# Altium PCB ide_podule-8bit_horiz.PcbDoc
Units mm, origin at the board's own origin, x right, y up, seen from the top; angles counter-clockwise.
Board outline 131.8 x 66.47 mm, 4 copper layers (Top Layer, GND, VCC, Bottom Layer), stack 0.603 mm thick; 34 components, 77 nets, 354 pads, 143 vias.
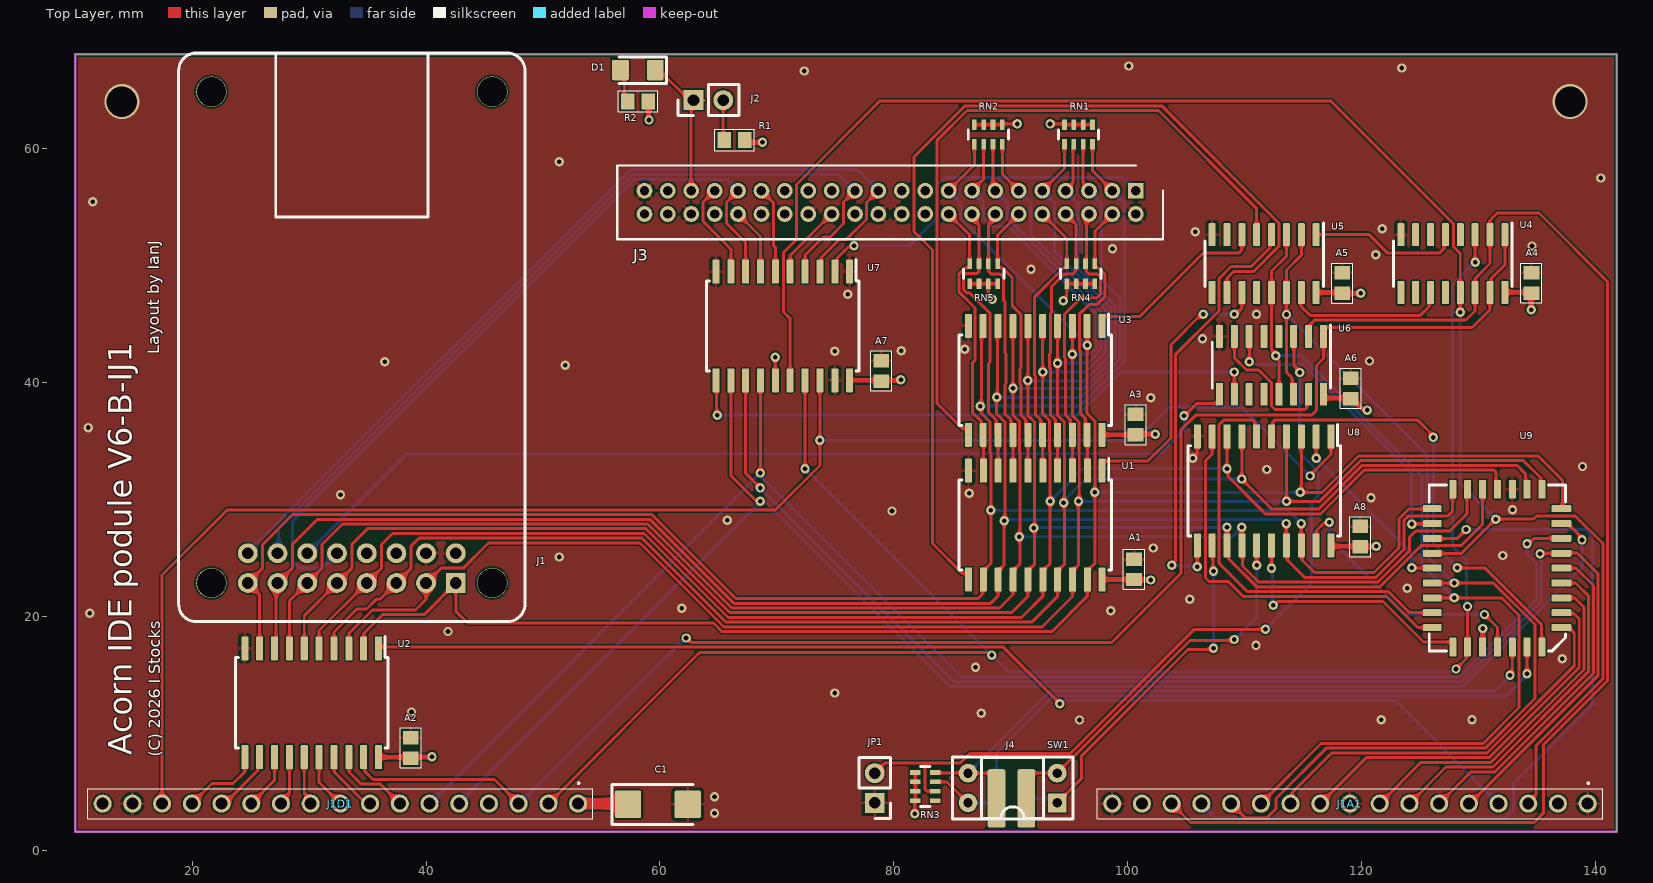
[diagram p0: Top Layer view]
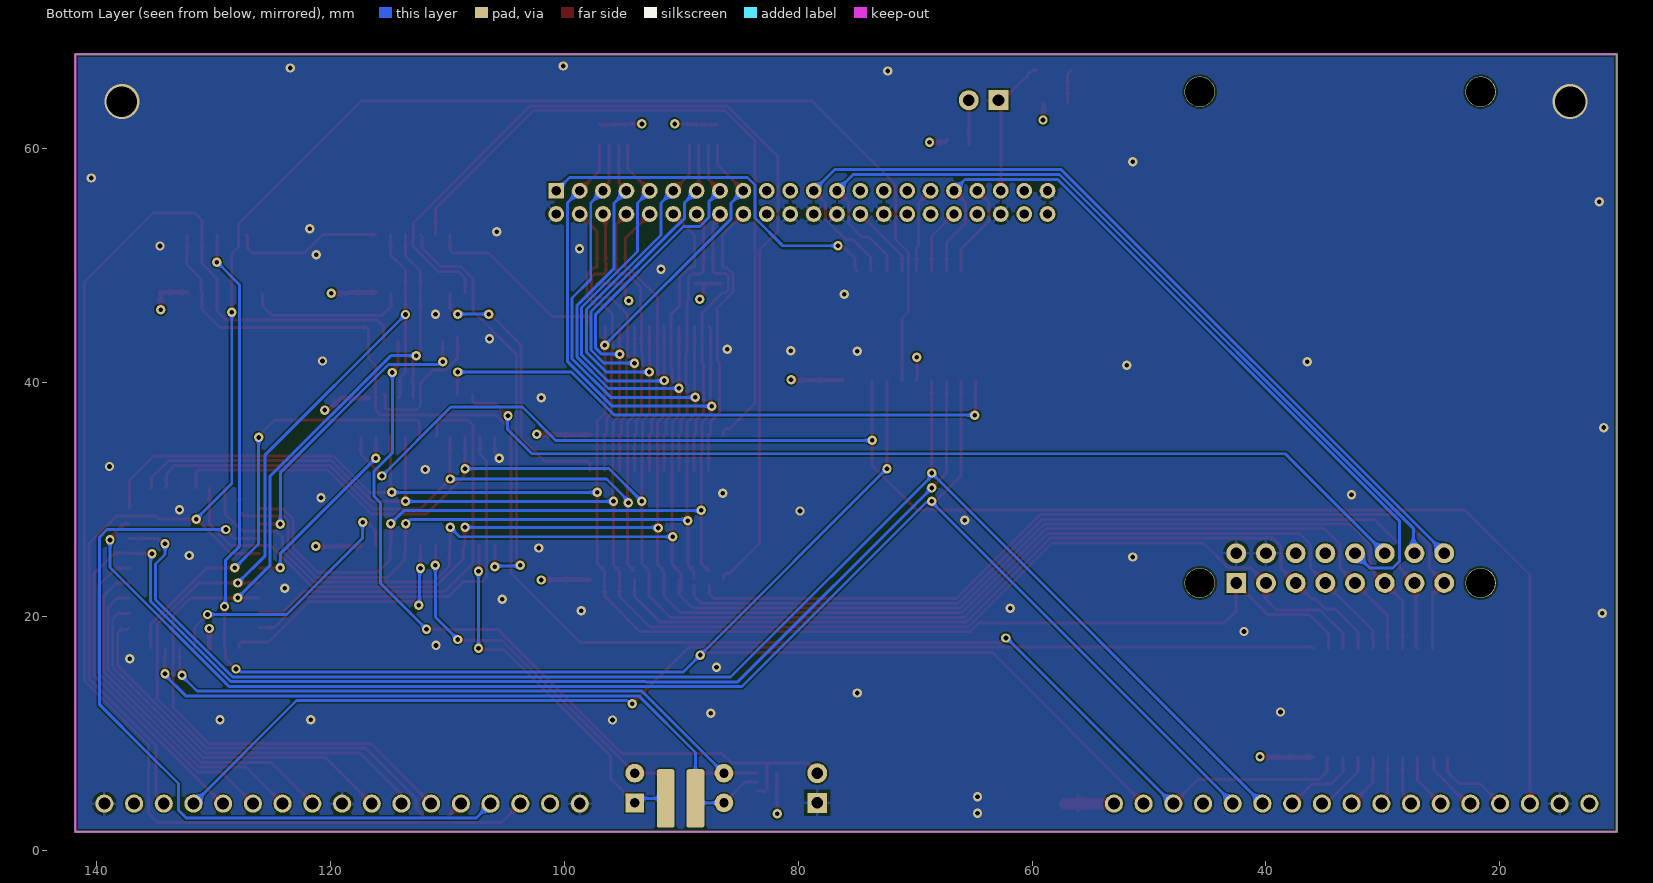
[diagram p1: Bottom Layer view, seen from below]
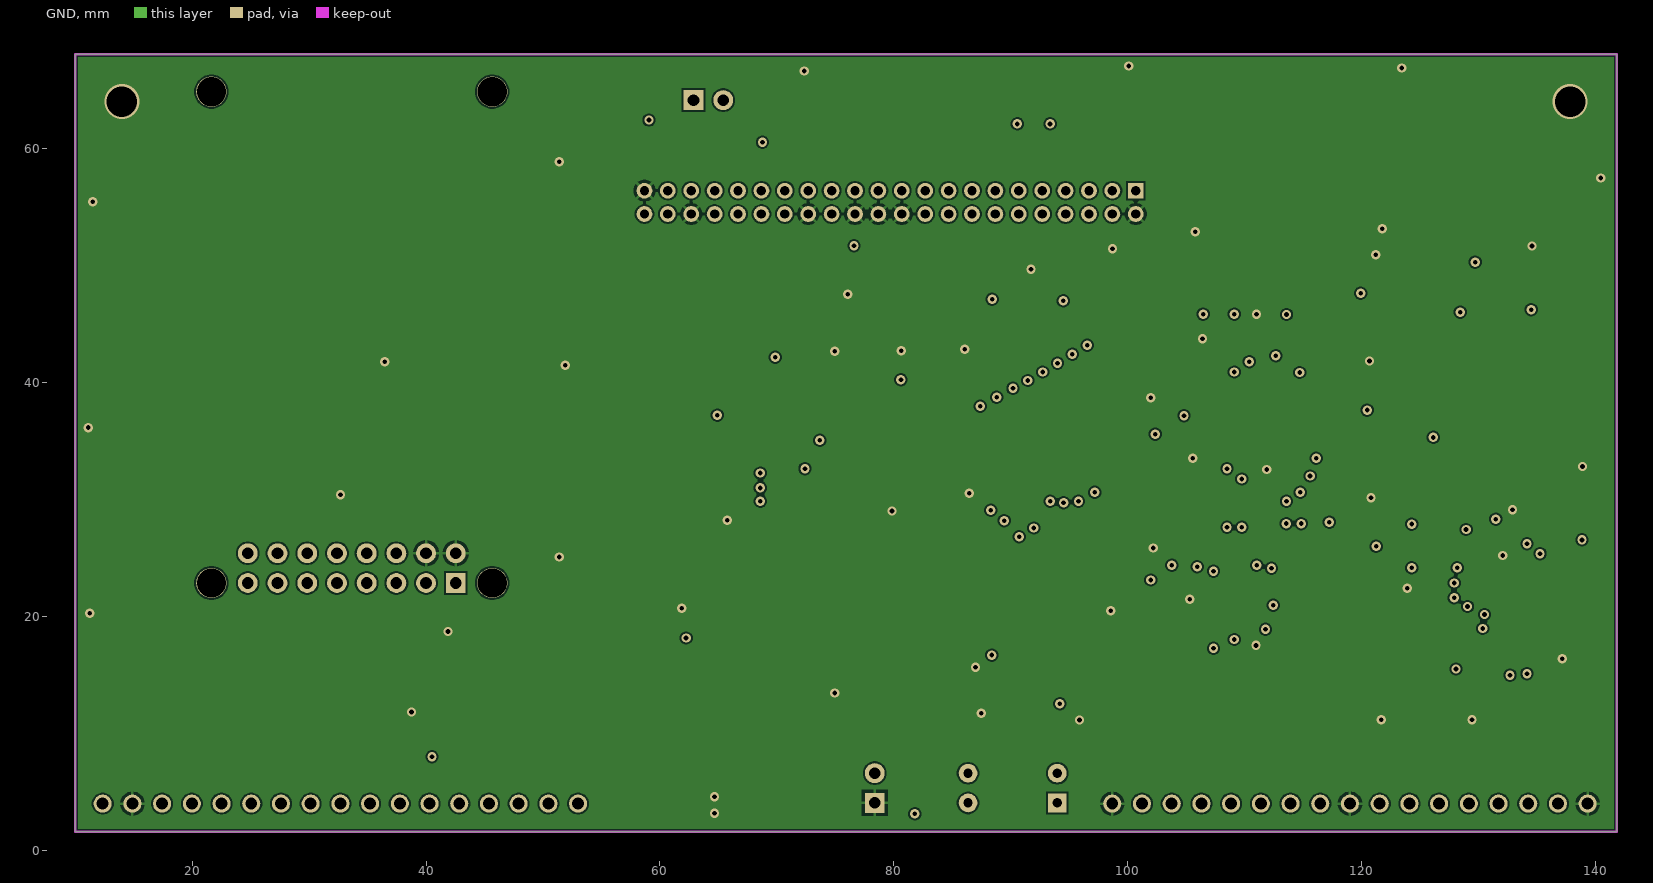
[diagram p2: GND]
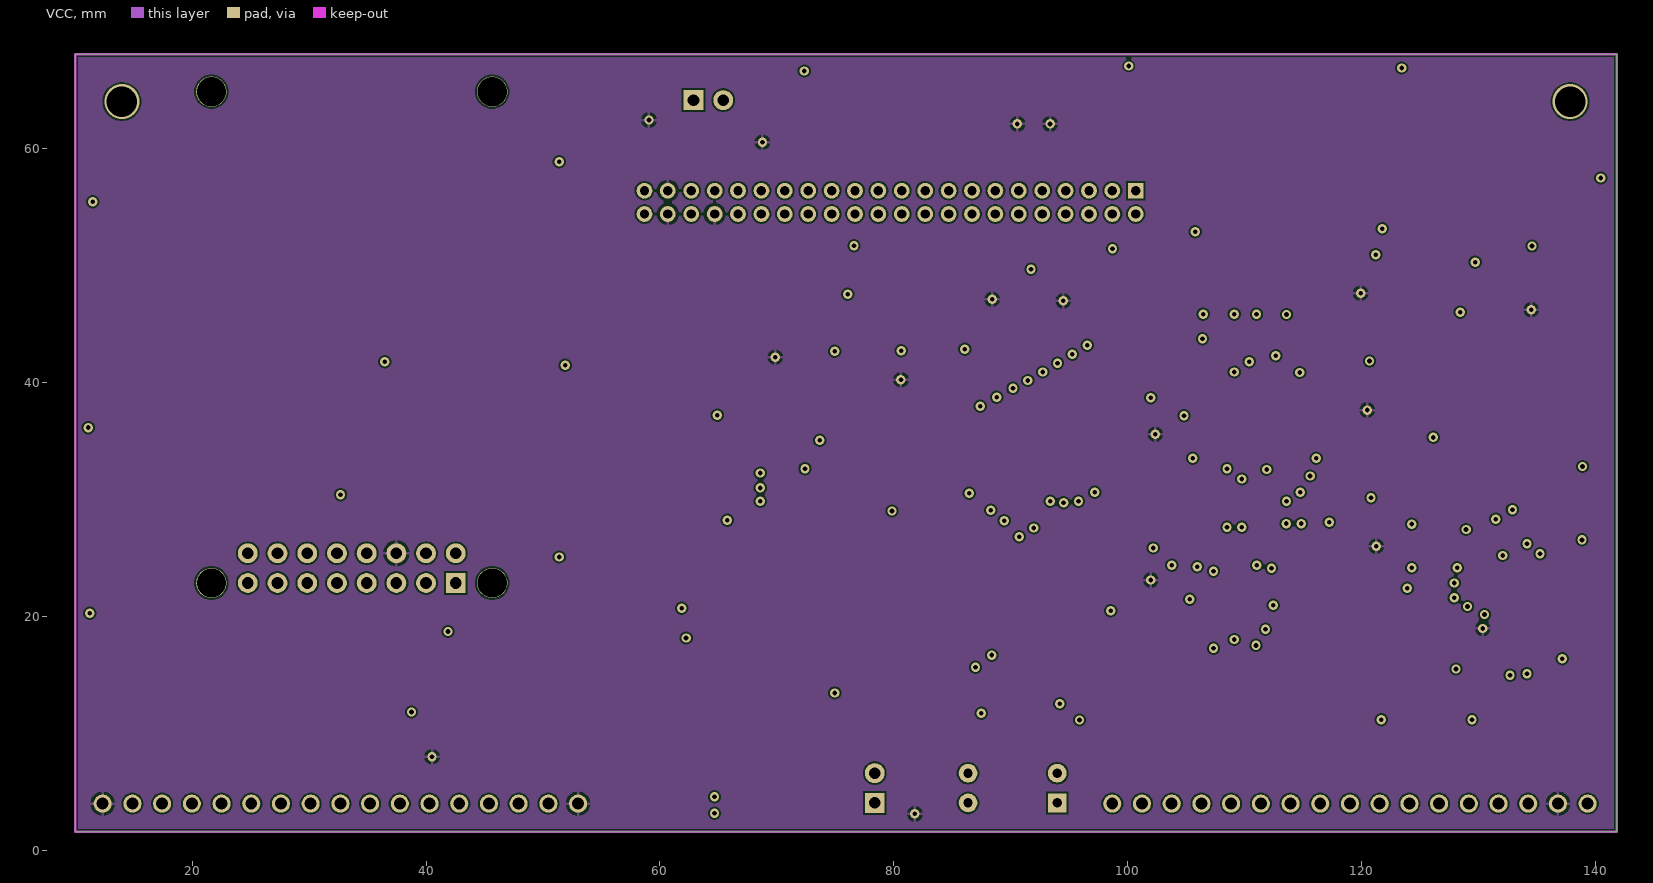
[diagram p3: VCC]

## Layer stack, top to bottom
Top Solder: solder mask 0.0102, Solder Resist, Dk 3.5
Top Layer: signal copper 0.0356
Dielectric 1: prepreg 0.0711, PP-006, Dk 4.1
GND: signal copper 0.035
Dielectric 2: prepreg 0.0711, PP-006, Dk 4.1
VCC: signal copper 0.035
Dielectric2: dielectric 0.32, FR-4, Dk 4.8
Bottom Layer: signal copper 0.0356
Bottom Solder: solder mask 0.0102, Solder Resist, Dk 3.5

## Board outline
10,1.6 141.8,1.6 141.8,68.072 10,68.072

## Design rules (kind name [scope] priority, off if disabled: settings)
Clearance [All] p1: gap=0.15 ignorepadtopadclearanceinfootprint=FALSE
DiffPairsRouting [All] p1: maxlimit=0.254 minlimit=0.254 mostfreqgap=0.254 toplayer_minwidth=0.254 toplayer_maxwidth=0.381 toplayer_prefwidth=0.254 midlayer1_minwidth=0.254 midlayer1_maxwidth=0.381 midlayer1_prefwidth=0.254 midlayer2_minwidth=0.254 midlayer2_maxwidth=0.381 midlayer2_prefwidth=0.254 bottomlayer_minwidth=0.254 bottomlayer_maxwidth=0.381 bottomlayer_prefwidth=0.254 maxuncoupledlength=12.7
MinimumSolderMaskSliver [All] p1: minsoldermaskwidth=0.1
PolygonConnect [All] p1: connectstyle=Relief reliefconductorwidth=0.254 reliefentries=4 polygonreliefangle="90 Angle" airgapwidth=0.254
RoutingVias [All] p1: holewidth=0.4 width=0.8 viastyle="Through Hole" minholewidth=0.3 minwidth=0.8 maxholewidth=0.711 maxwidth=1.27
SilkToSolderMaskClearance [IsPad] p1: minsilkscreentomaskgap=0.001 clearancetoexposedcopper=TRUE
SolderMaskExpansion [All] p1: expansion=0.102 istentingtop=FALSE
SupplyNets "Schematic Supply Nets_10" [InNet('VCC')] p1: voltage=0.000
SupplyNets "Schematic Supply Nets_3" [InNet('GND')] p2: voltage=0.000
Width [All] p1: maxlimit=0.4 minlimit=0.254 preferedwidth=0.254
27 further rules are at their usual default settings.

## Components (designator, comment, footprint, x,y, rotation, side; value= is the part's Value field where it differs from the comment)
A1 "100n" "RES 0805" 100.52,24.034 r90 top
A2 "100n" "RES 0805" 38.69,8.772 r90 top
A3 "100n" "RES 0805" 100.649,36.399 r90 top
A4 "100n" "RES 0805" 134.493,48.514 r90 top
A5 "100n" "RES 0805" 118.313,48.489 r90 top
A6 "100n" "RES 0805" 119.05,39.497 r90 top
A7 "100n" "RES 0805" 78.92,40.993 r90 top
A8 "100n" "RES 0805" 119.863,26.822 r90 top
C1 "47uF 16V" CP_EIA-6032-20_AVX-F_Pad2.25x2.35mm_HandSolder 59.817,3.937 r0 top
D1 "LED" LED_1206_3216Metric_Pad1.42x1.75mm_HandSolder 58.109,66.708 r180 top
J1 "Conn_02x08_Odd_Even" CH376-mod 24.765,22.86 r180 top
J1A1 "CONN_01X17" TSW-117-XX-YY-S 139.3,4 r180 top
J1D1 "CONN_01X17" TSW-117-XX-YY-S 53,4 r180 top
J2 "CONN_01X02" PinHeader_1x02_P2.54mm_Vertical 62.865,64.135 r90 top
J3 "CONN_02X20" SHDR44W55P200_2X22_4665X630X640P 100.67,56.399 r180 top
J4 "Conn_01x04_Socket" "4 way edge" 91.313,1.905 r180 top
JP1 "Jumper_NC_Small" PinHeader_1x02 78.359,4.064 r180 top
R1 "330R" "RES 0805" 66.365,60.728 r0 top
R2 "330R" "RES 0805" 58.11,64.03 r0 top
RN1 "4K7" R_Array_Concave_4x0603 95.77,61.199 r270 top
RN2 "4K7" R_Array_Concave_4x0603 88.07,61.199 r270 top
RN3 "4K7" R_Array_Concave_4x0603 82.677,5.461 r0 top
RN4 "4K7" R_Array_Concave_4x0603 95.97,49.299 r90 top
RN5 "4K7" R_Array_Concave_4x0603 87.67,49.299 r90 top
SW1 "SW_DIP_x02" DIP-4_W7.62mm_Socket 93.955,4.064 r180 top
U1 "74HC574" SOIC-20W_7.5x12.8mm_P1.27mm 92.086,27.813 r270 top
U2 "74HC245" SOIC-20W_7.5x12.8mm_P1.27mm 30.226,12.622 r270 top
U3 "74HC574" SOIC-20W_7.5x12.8mm_P1.27mm 92.075,40.181 r270 top
U4 "74HC139" SOIC-16_3.9x9.9mm_P1.27mm 127.773,50.165 r270 top
U5 "74HC139" SOIC-16_3.9x9.9mm_P1.27mm 111.644,50.165 r270 top
U6 "74HC139" SOIC-16_3.9x9.9mm_P1.27mm 112.268,41.467 r270 top
U7 "74HC245" SOIC-20W_7.5x12.8mm_P1.27mm 70.496,44.831 r270 top
U8 "74HC273" SOIC-20W_7.5x12.8mm_P1.27mm 111.644,30.734 r270 top value=74AHC273
U9 "SST39SF010" PLCC-32_11.4x14.0mm_P1.27mm 131.583,24.13 r180 top locked

## Footprints (in the part's own frame and the unit in brackets; to place one, negate y for a bottom-side part, rotate by r counter-clockwise, add the part's x,y. Pads: shape width x height; smd on the part's side, far side on the other; paste and mask are expansions set on the pad)
"4 way edge" [mm]
  rrect25% 1.524x5 smd paste-5 mask+0.2: 1(0,-2.54) 2(2.54,-2.54)
  rrect25% 1.524x5 smd far side paste-5 mask+0.2: 3(0,-2.54) 4(2.54,-2.54)
CH376-mod [mm]
  rect 1.7x1.7 hole 1 paste-2539.97 mask+0.2: 1(-17.78,0)
  round 1.7 hole 1 paste-2539.97 mask+0.2: 2(-17.78,-2.54) 3(-15.24,0) 4(-15.24,-2.54) 5(-12.7,0) 6(-12.7,-2.54) 7(-10.16,0) 8(-10.16,-2.54) 9(-7.62,0) 10(-7.62,-2.54) 11(-5.08,0) 12(-5.08,-2.54) 13(-2.54,0) 14(-2.54,-2.54) 15(0,0) 16(0,-2.54)
  round 2.6 hole 2.5 paste-2539.97 mask+0.2: M(-20.89,0) M(-20.89,-42) M(3.11,0) M(3.11,-42)
  silkscreen extent -23.69,-45.3 5.91,3.3
CP_EIA-6032-20_AVX-F_Pad2.25x2.35mm_HandSolder [mm]
  rrect11% 2.25x2.35 smd mask+0.2: 1(-2.55,0) 2(2.55,0)
  silkscreen extent -3.94,-1.71 3,1.71
DIP-4_W7.62mm_Socket [mm]
  rect 1.6x1.6 hole 0.8 paste-2539.97 mask+0.2: 1(0,0)
  rrect100% 1.6x1.6 hole 0.8 paste-2539.97 mask+0.2: 2(0,-2.54) 3(7.62,-2.54) 4(7.62,0)
  silkscreen extent -1.33,-3.93 8.95,1.39
LED_1206_3216Metric_Pad1.42x1.75mm_HandSolder [mm]
  rrect18% 1.425x1.75 smd mask+0.2: 1(-1.488,0) 2(1.488,0)
  silkscreen extent -2.46,-1.13 1.6,1.13
PinHeader_1x02 [mm]
  rect 1.7x1.7 hole 1 paste-2539.97 mask+0.2: 1(0,0)
  rrect100% 1.7x1.7 hole 1 paste-2539.97 mask+0.2: 2(0,-2.54)
  silkscreen extent -1.33,-3.87 1.33,1.33
PinHeader_1x02_P2.54mm_Vertical [mm]
  rect 1.7x1.7 hole 1 paste-2539.97 mask+0.2: 1(0,0)
  rrect100% 1.7x1.7 hole 1 paste-2539.97 mask+0.2: 2(0,-2.54)
  silkscreen extent -1.33,-3.87 1.33,1.33
PLCC-32_11.4x14.0mm_P1.27mm [mm]
  rrect25% 0.6x1.6 smd mask+0.2: 1(0,6.737) 2(-1.27,6.737) 3(-2.54,6.737) 4(-3.81,6.737) 14(-3.81,-6.737) 15(-2.54,-6.737) 16(-1.27,-6.737) 17(0,-6.737) 18(1.27,-6.737) 19(2.54,-6.737) 20(3.81,-6.737) 30(3.81,6.737) 31(2.54,6.737) 32(1.27,6.737)
  rrect25% 1.7x0.6 smd mask+0.2: 5(-5.463,5.08) 6(-5.463,3.81) 7(-5.463,2.54) 8(-5.463,1.27) 9(-5.463,0) 10(-5.463,-1.27) 11(-5.463,-2.54) 12(-5.463,-3.81) 13(-5.463,-5.08)
  rrect25% 1.6x0.6 smd mask+0.2: 21(5.563,-5.08) 22(5.563,-3.81) 23(5.563,-2.54) 24(5.563,-1.27) 25(5.563,0) 26(5.563,1.27) 27(5.563,2.54) 28(5.563,3.81) 29(5.563,5.08)
  silkscreen extent -5.82,-7.09 5.82,7.09
R_Array_Concave_4x0603 [mm]
  rect 0.9x0.4 smd mask+0.2: 1(-0.85,1.2) 2(-0.85,0.4) 3(-0.85,-0.4) 4(-0.85,-1.2) 5(0.85,-1.2) 6(0.85,-0.4) 7(0.85,0.4) 8(0.85,1.2)
  silkscreen extent -0.4,-1.72 0.4,1.72
"RES 0805" [mm] "Chip Resistor, 2-Leads, Body 2.00x1.25mm, IPC Medium Density"
  rect 1.15x1.35 smd: 1(-0.875,0) 2(0.875,0)
  silkscreen extent -1.7,-0.9 1.7,0.9, body extent -0.95,-0.62 1.05,0.63, height 0.6
SHDR44W55P200_2X22_4665X630X640P [mm]
  rect 1.35x1.35 hole 0.8: 1(0,0)
  round 1.35 hole 0.8: 2(0,2) 3(2,0) 4(2,2) 5(4,0) 6(4,2) 7(6,0) 8(6,2) 9(8,0) 10(8,2) 11(10,0) 12(10,2) 13(12,0) 14(12,2) 15(14,0) 16(14,2) 17(16,0) 18(16,2) 19(18,0) 20(18,2) 21(20,0) 22(20,2) 23(22,0) 24(22,2) 25(24,0) 26(24,2) 27(26,0) 28(26,2) 29(28,0) 30(28,2) 31(30,0) 32(30,2) 33(32,0) 34(32,2) 35(34,0) 36(34,2) 37(36,0) 38(36,2) 39(38,0) 40(38,2) 41(40,0) 42(40,2) 43(42,0) 44(42,2)
  silkscreen extent -2.32,-2.15 44.32,4.15, body extent -2.32,-2.15 44.33,4.15, height 6.2
SOIC-16_3.9x9.9mm_P1.27mm [mm]
  rrect25% 1.95x0.6 smd mask+0.2: 1(-2.475,4.445) 2(-2.475,3.175) 3(-2.475,1.905) 4(-2.475,0.635) 5(-2.475,-0.635) 6(-2.475,-1.905) 7(-2.475,-3.175) 8(-2.475,-4.445) 9(2.475,-4.445) 10(2.475,-3.175) 11(2.475,-1.905) 12(2.475,-0.635) 13(2.475,0.635) 14(2.475,1.905) 15(2.475,3.175) 16(2.475,4.445)
  silkscreen extent -3.45,-5.06 1.95,5.06
SOIC-20W_7.5x12.8mm_P1.27mm [mm]
  rrect25% 2.05x0.6 smd mask+0.2: 1(-4.65,5.715) 2(-4.65,4.445) 3(-4.65,3.175) 4(-4.65,1.905) 5(-4.65,0.635) 6(-4.65,-0.635) 7(-4.65,-1.905) 8(-4.65,-3.175) 9(-4.65,-4.445) 10(-4.65,-5.715) 11(4.65,-5.715) 12(4.65,-4.445) 13(4.65,-3.175) 14(4.65,-1.905) 15(4.65,-0.635) 16(4.65,0.635) 17(4.65,1.905) 18(4.65,3.175) 19(4.65,4.445) 20(4.65,5.715)
  silkscreen extent -5.68,-6.51 3.86,6.51
TSW-117-XX-YY-S [mm]
  round 1.55 hole 1.02: 1(0,0) 2(2.54,0) 3(5.08,0) 4(7.62,0) 5(10.16,0) 6(12.7,0) 7(15.24,0) 8(17.78,0) 9(20.32,0) 10(22.86,0) 11(25.4,0) 12(27.94,0) 13(30.48,0) 14(33.02,0) 15(35.56,0) 16(38.1,0) 17(40.64,0)
  silkscreen extent -1.27,-1.8 41.91,1.27

## Part data
A1 A2 A3 A4 A5 A6 A7 A8: library part C_Small
C1: library part CP
J3: library part CONN_02X22
JP1: library part Jumper_NC_Small-Device
R1 R2: library part R
RN1 RN2 RN3 RN4 RN5: library part R_Pack04
U1 U3: library part 74HCT574_PWR
U4 U5 U6: library part 74LS139
U8: library part 74AHC273
U9: library part SST39SF040

## Via types
v1: diameter 0.8, hole 0.4, Top Layer to Bottom Layer, tented both sides, 141 vias
v2: diameter 3, hole 2.6, Top Layer to Bottom Layer, 2 vias

## Nets (pads, with @x,y where several pads share a name; then routed paths per layer and width w, separated by ;. In a path a pad name is that pad's centre, name@x,y a point inside that pad or via, vN(x,y) a via of type N, cw(c..) or ccw(c..) an arc to the next point about the centre after c; other vN are vias at no path point)
BCS0: J3.37 U7.9 | length 8.3
  Top Layer w0.254: J3.37 63.679,55.408 63.679,53.791 66.051,51.42 U7.9
BCSEL: J3.28 U7.5 | length 6.4
  Top Layer w0.254: U7.5 71.131,50.86 J3.28
BD0: J1D1.7 U2.18 | length 6.7
  Top Layer w0.254: U2.18 33.417,7.956 33.417,6.715 34.471,5.661 36.099,5.661 J1D1.7
BD1: J1D1.8 U2.17 | length 5.5
  Top Layer w0.254: U2.17 32.147,7.956 32.147,6.715 34.478,4.384 34.485,4.384 34.869,4 J1D1.8
BD2: J1D1.9 U2.16 | length 4.7
  Top Layer w0.254: U2.16 30.861,5.819 J1D1.9
BD3: J1D1.10 U2.15 | length 4.2
  Top Layer w0.254: U2.15 29.591,4.9 30.14,4.351 J1D1.10
BD4: J1D1.11 U2.14 | length 4.3
  Top Layer w0.254: J1D1.11 27.6,4.193 28.321,4.914 U2.14
BD5: J1D1.12 U2.13 | length 4.8
  Top Layer w0.254: J1D1.12 27.051,5.991 U2.13
BD6: J1D1.13 U2.12 | length 5.5
  Top Layer w0.254: J1D1.13 22.796,4 25.619,6.823 25.619,7.81 U2.12
BD7: J1D1.14 U2.11 | length 6.9
  Top Layer w0.254: J1D1.14 21.695,5.715 23.495,5.715 24.495,6.715 24.495,7.956 U2.11
BLA2: J1.10 J3.35 U7.8 | length 66.6
  Top Layer w0.254: J3.35 65.675,55.404 65.675,53.609 67.321,51.963 U7.8
  Bottom Layer w0.254: J1.10 31.115,24.13 29.181,24.13 28.575,24.736 28.575,28.131 57.795,57.351 65.718,57.351 J3.35
BLA3: J3.33 U7.6 | length 7.4
  Top Layer w0.254: J3.33 69.718,55.351 69.718,51.694 69.861,51.551 U7.6
BLA4: J3.36 U7.7 | length 5.7
  Top Layer w0.254: J3.36 68.591,52.478 U7.7
CLK2: J1D1.4
CS0: U6.10 U7.11 | length 50.6
  Top Layer w0.254: U7.11 64.839,40.123 64.839,37.269 v1(64.897,37.211) ; U6.10 v1(109.093,40.894)
  Bottom Layer w0.254: v1(64.897,37.211) 95.694,37.211 99.377,40.894 v1(109.093,40.894)
D0: J1.1 J3.17 RN2.5 U1.19 U2.2 U3.2 U8.3 U9.13 | length 165.3
  Top Layer w0.254: U2.2 34.671,18.542 36.283,20.154 39.839,20.154 J1.1 42.545,20.447 43.561,19.431 64.581,19.431 65.308,18.704 93.514,18.704 96.531,21.721 96.531,23.888 97.166,24.523 v1(97.166,30.607) 97.166,36.703 96.52,37.349 v1(96.52,43.18) U3.2 ; J3.17 86.87,58.599 RN2.5 ; v1(114.735,30.607) v1@114.819,30.607 ; U8.3 v1@114.819,30.607 ; U9.13@137.146,29.21 137.146,31.648 135.07,33.724 119.703,33.724 116.586,30.607 v1@114.819,30.607
  Bottom Layer w0.254: J3.17 85.718,55.351 85.718,54.005 96.52,43.203 v1(96.52,43.18) ; v1(97.166,30.607) v1(114.735,30.607)
D1: J1.3 J3.15 RN2.6 U1.18 U2.3 U3.3 U8.4 U9.14 | length 168.2
  Top Layer w0.254: U2.3 33.401,18.542 35.417,20.558 39.1,20.558 40.005,21.463 J1.3 41.275,24.13 43.18,24.13 45.339,26.289 58.294,26.289 65.475,19.108 92.652,19.108 95.261,21.717 95.261,23.888 95.769,24.396 v1(95.769,29.845) 95.838,29.914 95.838,34.025 95.827,34.036 95.827,36.627 95.25,37.204 U3.3 ; J3.15 87.67,57.399 RN2.6 ; U8.4 v1(113.549,29.845) 116.395,29.845 119.87,33.32 133.823,33.32 135.272,31.871 135.272,31.088 U9.14@135.393,30.967
  Bottom Layer w0.254: J3.15 87.622,55.447 87.622,54.101 88.383,53.34 89.789,53.34 97.294,45.835 97.294,42.938 96.774,42.418 v1(95.25,42.418) ; v1(95.769,29.845) v1(113.549,29.845)
D2: J1.5 J3.13 RN2.7 U1.17 U2.4 U3.4 U8.7 U9.15 | length 168.4
  Top Layer w0.254: U2.4 32.131,18.678 34.084,20.631 34.918,20.631 35.797,21.509 36.114,21.509 38.735,24.13 38.735,26.035 39.393,26.693 58.461,26.693 65.642,19.512 91.775,19.512 93.991,21.728 U1.17 ; RN2.7 88.47,56.599 J3.13 ; U3.4 93.98,37.204 94.557,36.627 94.557,33.909 94.568,33.898 94.568,29.787 v1(94.499,29.718) 94.568,29.649 94.568,24.465 93.991,23.888 U1.17@93.991,23.876 ; U8.7 v1(109.739,31.75) 112.321,29.168 116.29,29.168 120.038,32.916 133.251,32.916 134.002,32.165 134.002,31.088 U9.15@134.123,30.967
  Bottom Layer w0.254: J3.13 89.718,55.351 89.718,54.005 90.276,53.447 90.317,53.447 97.698,46.066 97.698,42.77 96.584,41.656 v1(93.98,41.656) ; v1(94.499,29.718) 94.499,29.866 96.383,31.75 v1(109.739,31.75)
D3: J1.7 J3.11 RN2.8 U1.16 U2.5 U3.5 U8.8 U9.17 | length 169.9
  Top Layer w0.254: U2.5 30.861,18.796 J1.7 36.195,24.13 36.195,26.162 37.13,27.097 58.629,27.097 65.81,19.916 90.909,19.916 92.721,21.728 92.721,23.888 93.356,24.523 v1(93.356,29.845) 93.356,34.094 93.287,34.163 93.287,36.754 92.71,37.331 U3.5 ; RN2.8 89.27,57.799 J3.11 ; U8.8 v1(108.469,32.639) 108.573,32.535 108.573,31.958 111.364,29.168 111.768,28.764 116.457,28.764 120.205,32.512 131.298,32.512 131.446,32.363 131.446,31.104 U9.17@131.583,30.967
  Bottom Layer w0.254: J3.11 91.718,55.351 91.718,52.617 98.102,46.233 98.102,42.603 96.393,40.894 v1(92.71,40.894) ; v1(93.356,29.845) 96.15,32.639 v1(108.469,32.639)
D4: J1.9 J3.9 RN1.5 U1.15 U2.6 U3.6 U8.13 U9.18 | length 172.6
  Top Layer w0.254: U2.6 29.591,20.066 J1.9 33.655,24.13 33.655,26.162 34.994,27.501 58.796,27.501 65.977,20.32 90.043,20.32 91.451,21.728 U1.15 91.451,23.888 92.028,24.465 92.028,27.49 v1(91.959,27.559) 92.028,27.628 92.028,34.025 92.017,34.036 92.017,36.627 91.44,37.204 U3.6 ; J3.9 94.57,58.299 RN1.5 ; v1(108.469,27.621) U8.13 108.619,25.934 108.619,24.922 111.004,22.537 121.544,22.537 125.069,26.062 128.492,26.062 130.313,27.883 U9.18@130.313,30.967
  Bottom Layer w0.254: v1(91.44,40.174) 91.482,40.132 96.266,40.132 98.506,42.372 98.506,46.401 93.718,51.189 93.718,55.351 J3.9 ; v1(91.959,27.559) 92.021,27.621 v1(108.469,27.621)
D5: J1.11 J3.7 RN1.6 U1.14 U2.7 U3.7 U8.14 U9.19 | length 175.5
  Top Layer w0.254: U2.7 28.321,21.336 J1.11 31.115,24.13 31.115,26.162 32.858,27.905 58.963,27.905 66.144,20.724 89.027,20.724 90.181,21.878 U1.14 ; U1.14@90.008,22.265 90.008,23.715 90.758,24.465 90.758,34.025 90.747,34.036 90.747,36.627 90.17,37.204 U3.7 ; J3.7 94.67,56.428 95.297,57.055 95.297,60.276 RN1.6 ; v1(109.739,27.621) U8.14 109.799,26.024 109.799,24.313 111.171,22.941 121.377,22.941 124.062,25.627 124.062,26.769 124.598,27.305 127.508,27.305 128.98,28.777 128.98,30.904 U9.19@129.043,30.967
  Bottom Layer w0.254: v1(90.17,39.497) 96.203,39.497 98.91,42.204 98.91,46.568 95.718,49.76 95.718,55.351 J3.7 ; v1(90.701,26.815) 108.933,26.815 v1(109.739,27.621)
D6: J1.13 J3.5 RN1.7 U1.13 U2.8 U3.8 U8.17 U9.20 | length 176.7
  Top Layer w0.254: U2.8 27.178,17.399 27.178,22.733 28.575,24.13 28.575,26.162 30.722,28.309 59.131,28.309 66.312,21.128 88.265,21.128 88.911,21.774 U1.13@88.911,22.714 ; U3.8 88.837,44.767 88.837,38.798 v1(88.773,38.735) 88.773,37.331 89.477,36.627 89.477,34.036 89.488,34.025 89.488,28.263 v1(89.419,28.194) 89.419,24.396 88.911,23.888 U1.13 ; RN1.7 96.17,57.096 96.67,56.596 J3.5 ; v1(113.538,27.94) 113.543,27.935 113.543,26.089 113.609,26.024 113.609,24.832 115.096,23.345 121.209,23.345 123.58,25.715 123.58,28.195 123.96,28.575 127.33,28.575 127.753,28.997 U9.20@127.753,30.988
  Bottom Layer w0.254: v1(88.773,38.735) 96.012,38.735 99.314,42.037 99.314,47.226 97.718,48.822 97.718,55.351 J3.5 ; v1(89.419,28.194) 89.523,28.298 113.116,28.298 113.475,27.94 v1(113.538,27.94)
D7: J1.15 J3.3 RN1.8 U1.12 U2.9 U3.9 U8.18 U9.21 | length 177.2
  Top Layer w0.254: U2.9 25.781,21.844 J1.15 26.035,24.13 26.035,26.162 28.586,28.713 59.298,28.713 66.479,21.532 87.197,21.532 87.503,21.838 87.503,21.844 87.576,21.917 87.576,22.649 U1.12@87.641,22.714 ; U3.9 87.48,44.681 87.48,38.077 v1(87.376,37.973) 87.48,37.869 87.48,37.353 88.207,36.627 88.207,34.036 88.276,33.967 v1(88.276,29.083) 88.276,24.523 U1.12@87.641,23.888 ; RN1.8 96.97,58.099 J3.3 ; v1(114.808,27.94) 114.813,27.935 114.813,26.162 114.777,26.126 114.879,26.024 114.879,24.832 115.962,23.749 121.042,23.749 123.176,25.883 123.176,28.362 124.003,29.189 U9.21@125.583,29.189 ; U9.21@125.583,29.21 U9.21
  Bottom Layer w0.254: v1(87.376,37.973) 95.885,37.973 99.718,41.806 99.718,55.351 J3.3 ; v1(88.276,29.083) 88.318,29.041 113.707,29.041 v1(114.808,27.94)
D8: J3.4 RN4.5 U1.2 U3.19 | length 24.6
  Top Layer w0.254: U1.2 96.526,32.468 96.526,35.525 96.361,35.69 96.361,36.937 95.927,37.371 95.927,42.698 95.843,42.782 95.843,45.827 96.665,46.649 97.329,46.649 98.051,47.371 98.051,49.216 97.441,49.826 97.243,49.826 97.17,49.899 97.17,52.899 J3.4
D9: J3.6 RN4.6 U1.3 U3.18 | length 25.4
  Top Layer w0.254: U1.3 95.256,32.468 95.256,35.525 U3.18 95.077,35.704 95.077,36.805 94.657,37.225 94.657,42.054 94.573,42.138 94.573,45.827 95.99,47.244 97.353,47.244 97.647,47.538 97.647,49.014 97.381,49.28 96.655,49.28 96.418,49.517 96.418,50.101 RN4.6 96.443,50.222 96.443,54.172 J3.6
D10: J3.8 RN4.7 U1.4 U3.17 | length 24
  Top Layer w0.254: U1.4 93.986,32.468 93.986,35.525 U3.17 93.807,35.704 93.807,36.805 93.387,37.225 93.387,41.174 93.303,41.258 93.303,42.435 93.387,42.519 93.387,45.913 93.448,45.974 93.448,48.168 94.559,49.28 95.295,49.28 95.527,49.511 95.527,50.106 RN4.7 95.57,53.499 J3.8
D11: J3.10 RN4.8 U1.5 U3.16 | length 24.3
  Top Layer w0.254: J3.10 94.77,52.299 RN4.8 94.77,49.899 94.697,49.826 94.534,49.826 92.033,47.325 92.033,40.614 92.117,40.53 92.117,37.225 92.537,36.805 92.537,35.704 U3.16 92.716,35.525 92.716,32.468 U1.5
D12: J3.12 RN5.5 U1.6 U3.15 | length 24
  Top Layer w0.254: J3.12 88.87,52.599 88.87,49.899 88.943,49.826 89.264,49.826 90.112,48.978 90.112,46.562 90.847,45.827 90.847,41.237 90.763,41.153 90.763,39.861 90.847,39.777 90.847,37.225 91.267,36.805 91.267,35.704 U3.15 91.446,35.525 91.446,32.468 U1.6
D13: J3.14 RN5.6 U1.7 U3.14 | length 23.6
  Top Layer w0.254: J3.14 88.67,54.062 88.07,53.462 RN5.6 88.099,50.12 88.099,49.497 88.316,49.281 89.08,49.281 89.347,49.014 89.347,47.049 89.493,46.903 89.493,42.519 89.577,42.435 89.577,39.914 89.493,39.83 89.493,37.309 89.997,36.805 89.997,35.704 U3.14 90.176,35.525 90.176,32.468 U1.7
D14: J3.16 RN5.7 U1.8 U3.13 | length 24.7
  Top Layer w0.254: J3.16 86.67,54.062 87.27,53.462 RN5.7 ; RN5.7@87.257,50.136 87.257,49.463 87.108,49.315 86.171,49.315 85.951,49.095 85.951,47.926 86.227,47.65 86.483,47.65 88.207,45.927 88.207,41.737 88.096,41.626 88.096,37.436 88.727,36.805 88.727,35.704 U3.13 88.906,35.525 88.906,32.468 U1.8
D15: J3.18 RN5.8 U1.9 U3.12 | length 24.3
  Top Layer w0.254: J3.18 86.47,52.599 86.47,49.899 86.397,49.826 86.111,49.826 85.547,49.262 85.547,47.759 86.937,46.369 86.937,41.897 86.699,41.659 86.699,37.444 87.465,36.678 87.465,35.696 87.636,35.525 87.636,32.468 U1.9
F_CE: U6.6 U9.22 | length 25.8
  Top Layer w0.254: v1(110.374,41.783) U6.6@110.374,43.623 ; v1(124.257,27.898) 124.278,27.919 125.999,27.919 U9.22
  Bottom Layer w0.254: v1(110.374,41.783) 110.522,41.783 110.776,41.529 115.003,41.529 124.257,32.276 v1(124.257,27.898)
F_EN: JP1.2 RN3.6 U6.3 | length 69.1
  Top Layer w0.254: JP1.2 79.243,7.488 82.672,7.488 ; RN3.6@83.524,5.064 82.821,5.064 82.672,5.213 82.672,7.488 ; v1(111.76,18.898) 105.677,18.898 95.053,8.274 86.481,8.274 85.696,7.488 82.672,7.488 ; U6.3@114.184,43.623 114.184,41.459 114.681,40.962 v1(114.681,40.852)
  Bottom Layer w0.254: v1(111.76,18.898) 115.697,22.835 115.697,29.718 116.247,30.268 116.247,32.413 114.681,33.979 v1(114.681,40.852)
GND: A1.2 A2.2 A3.2 A4.2 A5.2 A6.2 A7.2 A8.2 C1.2 J1.2 J1.4 J1A1.1 J1A1.9 J1A1.17 J1D1.16 J3.2 J3.22 J3.24 J3.26 J3.30 J3.40 J3.43 JP1.1 U1.10 U2.10 U3.10 U4.8 U5.8 U6.8 U7.1 U7.10 U7.19 U8.10 U9.16 | length 2
  Top Layer w0.254: v1(105.537,33.528) 105.537,33.586 105.929,33.978 U8.10
  other v1: 64.658,3.18 64.658,4.577 95.86,11.151 121.666,11.176 129.413,11.176 87.473,11.731 38.76,11.836 74.93,13.462 86.97,15.646 137.13,16.393 110.947,17.526 41.88,18.716 11.256,20.272 98.522,20.494 61.849,20.701 105.283,21.463 123.876,22.403 51.382,25.081 132.027,25.208 102.159,25.857 65.761,28.219 79.83,29.018 132.867,29.134 120.777,30.15 32.694,30.415 86.437,30.536 111.857,32.559 138.862,32.817 11.129,36.147 101.956,38.71 51.89,41.464 36.479,41.769 120.65,41.834 74.93,42.672 80.62,42.723 86.056,42.855 106.376,43.744 110.995,45.837 76.043,47.545 91.716,49.673 121.173,50.932 98.679,51.435 134.544,51.664 105.741,52.888 121.743,53.142 11.51,55.451 140.415,57.483 51.382,58.863 72.343,66.627 123.397,66.881 100.076,67.056
  other v2: 14,64.008 137.8,64.008
L0: U8.2 U9.25 | length 16.4
  Top Layer w0.254: v1(116.089,33.528) U8.2 ; v1(124.257,24.155) 124.269,24.143 126.008,24.143 U9.25
  Bottom Layer w0.254: v1(116.089,33.528) 124.257,25.36 v1(124.257,24.155)
L1: U8.5 U9.4 | length 39
  Top Layer w0.254: U8.5 112.372,35.477 112.372,36.603 112.547,36.779 124.765,36.779 126.111,35.433 v1(126.111,35.306) ; v1(128.143,24.155) 130.505,24.155 135.372,19.289 U9.4@135.372,17.314
  Bottom Layer w0.254: v1(126.111,35.306) 126.111,26.187 v1(128.143,24.155)
L2: U8.6 U9.28 | length 36.4
  Top Layer w0.254: U8.6 110.85,35.543 110.85,36.63 110.702,36.779 108.191,36.779 107.792,36.38 107.792,24.542 110.213,22.121 122.278,22.121 124.079,20.32 U9.28
L3: U8.9 U9.29 | length 33.5
  Top Layer w0.254: U8.9 107.199,33.895 106.622,33.318 106.622,23.299 106.934,22.987 108.585,22.987 109.855,21.717 122.11,21.717 124.777,19.05 U9.29
L4: J4.3 SW1.1 U8.12 | length 31.6
  Top Layer w0.254: SW1.1 96.012,6.121 96.012,8.052 105.128,17.168 107.211,17.168 v1(107.315,17.272) ; U8.12 107.257,26.026 107.257,23.934 v1(107.315,23.876)
  Bottom Layer w0.254: J4.3 93.574,4.445 SW1.1 ; v1(107.315,17.272) v1(107.315,23.876)
L5: J4.1 SW1.2 U8.15 | length 33.2
  Top Layer w0.254: J4.1 91.313,5.974 91.943,6.604 94.031,6.604 94.031,6.68 105.3,17.949 109.008,17.949 v1(109.093,18.034) ; v1(110.998,24.384) 111.003,24.389 111.003,26.078 U8.15
  Bottom Layer w0.254: v1(109.093,18.034) 110.998,19.939 v1(110.998,24.384)
L6: U8.16 U9.30 | length 22.5
  Top Layer w0.254: v1(112.268,24.13) 112.273,24.135 112.273,26.078 U8.16 ; v1(112.42,20.955) 112.512,20.955 112.842,21.285 121.793,21.285 125.26,17.818 127.6,17.818 127.773,17.645 U9.30@127.773,17.292
  Bottom Layer w0.254: v1(112.268,24.13) 112.344,24.054 112.344,21.031 v1(112.42,20.955)
L7: U8.19 U9.1 | length 23.3
  Top Layer w0.254: U8.19 116.114,26.109 116.114,27.341 116.736,27.963 117.117,27.963 v1(117.221,28.067) ; v1(130.48,20.168) 131.583,19.064 U9.1@131.583,17.292
  Bottom Layer w0.254: v1(117.221,28.067) 117.221,26.681 123.734,20.168 v1(130.48,20.168)
LA2: J1D1.5 U7.12 U9.12 | length 133.8
  Top Layer w0.254: U7.12 66.051,32.048 68.182,29.917 68.508,29.917 v1(68.58,29.845) ; U9.12@137.146,27.94 137.596,27.94 138.707,26.829 138.707,26.647 v1(138.811,26.543)
  Bottom Layer w0.254: J1D1.5 42.84,4.052 68.58,29.792 v1(68.58,29.845) 68.684,29.741 69.065,29.741 84.797,14.009 93.168,14.009 93.187,14.028 128.658,14.028 138.808,24.178 138.808,26.54 v1(138.811,26.543)
LA3: J1D1.6 U7.14 U9.11 | length 132.7
  Top Layer w0.254: v1(68.58,32.258) 68.586,32.264 68.586,40.175 U7.14 ; v1(134.112,26.213) 134.26,26.213 134.717,26.67 U9.11@137.146,26.67
  Bottom Layer w0.254: J1D1.6 40.311,4 68.569,32.258 v1(68.58,32.258) 68.684,32.154 68.684,31.9 85.767,14.817 92.834,14.817 92.853,14.836 128.323,14.836 134.925,21.438 134.925,24.486 134.112,25.298 v1(134.112,26.213)
LA4: J1A1.5 U7.13 U9.10 | length 120.3
  Top Layer w0.254: U7.13 67.321,32.247 v1(68.58,30.988) ; J1A1.5 130.205,4.983 140.196,14.974 140.196,23.634 138.389,25.441 137.186,25.441 137.133,25.387 135.242,25.387 v1(135.23,25.375)
  Bottom Layer w0.254: v1(68.58,30.988) 85.155,14.413 93.001,14.413 93.02,14.432 128.491,14.432 135.334,21.276 135.334,25.27 v1(135.23,25.375)
LA5: J1A1.6 U9.9 | length 28.6
  Top Layer w0.254: J1A1.6 129.32,6.72 131.371,6.72 139.792,15.141 139.792,22.641 138.303,24.13 U9.9@137.146,24.13
LA6: J1A1.7 U9.8 | length 29.1
  Top Layer w0.254: J1A1.7 127.184,7.124 131.203,7.124 139.388,15.309 139.388,21.736 138.264,22.86 U9.8@137.146,22.86
LA7: J1A1.8 U9.7 | length 29.7
  Top Layer w0.254: J1A1.8 125.048,7.528 131.036,7.528 138.984,15.476 138.984,20.782 138.176,21.59 U9.7@137.146,21.59
LA8: J1A1.10 U9.6 | length 32.8
  Top Layer w0.254: J1A1.10 120.372,7.932 130.869,7.932 138.58,15.643 138.58,19.789 138.109,20.26 137.206,20.26 U9.6@137.146,20.32
LA9: J1A1.11 U9.5 | length 33.6
  Top Layer w0.254: J1A1.11 114.06,4.16 114.06,4.967 117.429,8.336 130.701,8.336 138.151,15.785 138.151,18.593 137.866,18.877 137.319,18.877 U9.5@137.146,19.05
LA10: J1A1.12 U5.3 U5.13 U6.13 U9.27 | length 84.4
  Top Layer w0.254: J1A1.12 116.504,9.144 130.367,9.144 133.432,12.209 133.432,20.086 131.928,21.59 v1(127.889,21.59) U9.27 ; U6.13@112.914,38.673 112.914,41.878 112.649,42.143 112.649,42.439 112.279,42.809 U5.13 112.279,49.53 113.549,50.8 U5.3
  Bottom Layer w0.254: v1(112.649,42.291) 114.813,42.291 125.148,31.956 125.148,24.331 v1(127.889,21.59)
LA11: J1A1.13 U5.2 U5.14 U6.14 U9.26 | length 91.4
  Top Layer w0.254: J1A1.13 110.026,2.794 111.887,2.794 112.649,3.556 112.649,4.445 116.944,8.74 130.534,8.74 134.786,12.992 134.786,19.303 131.229,22.86 v1(127.889,22.86) U9.26 ; U6.14@114.184,38.673 114.029,38.828 114.029,40.403 113.549,40.883 U5.14 113.549,49.616 114.819,50.886 U5.2
  Bottom Layer w0.254: v1(113.559,45.815) 125.552,33.823 125.552,25.197 v1(127.889,22.86)
LA12: J1A1.14 U9.23 | length 67.9
  Top Layer w0.254: U9.23 126.042,26.649 128.122,26.649 v1(128.905,27.432)
  Bottom Layer w0.254: J1A1.14 107.523,2.757 132.285,2.757 132.969,3.441 132.969,5.715 135.708,8.454 139.7,12.446 139.7,26.797 139.065,27.432 v1(128.905,27.432)
LA13: J1A1.15 U4.2 U4.14 U6.2 | length 117.5
  Top Layer w0.254: J1A1.15 105.35,2.39 134.724,2.39 135.509,3.175 135.509,9.017 141.004,14.512 141.004,48.607 135.128,54.483 131.572,54.483 130.948,53.859 U4.2 130.948,50.165 129.68,48.897 129.68,47.692 129.668,47.68 129.668,46.102 128.905,45.339 115.962,45.339 115.454,44.831 U6.2@115.454,43.623
LRC: U1.11 U5.10 | length 84.2
  Top Layer w0.254: U1.11 86.371,23.522 86.198,23.695 85.839,23.695 83.289,26.245 83.289,51.316 81.718,52.887 81.718,59.302 86.066,63.65 102.892,63.65 112.902,53.64 112.902,51.64 110.769,49.507 109.07,49.507 108.469,48.906 U5.10
LROE: U1.1 U5.11 | length 24.1
  Top Layer w0.254: U1.1 97.801,33.113 97.974,33.286 101.702,33.286 103.678,35.261 103.678,43.226 106.299,45.847 v1(106.426,45.847) ; v1(109.093,45.847) 109.197,45.951 109.356,45.951 109.739,46.334 U5.11
  Bottom Layer w0.254: v1(106.426,45.847) v1(109.093,45.847)
LWC: U3.11 U5.5 | length 60.5
  Top Layer w0.254: U3.11 86.36,35.89 86.187,36.063 85.828,36.063 83.693,38.198 83.693,60.706 86.233,63.246 102.616,63.246 111.009,54.853 U5.5
LWOE: U3.1 U5.6 | length 16.3
  Top Layer w0.254: U3.1 97.79,45.481 97.963,45.654 101.026,45.654 106.426,51.054 109.474,51.054 109.739,51.319 U5.6
NetD1_1: D1.1 J2.1 J3.39 | length 13.1
  Top Layer w0.254: D1.1 59.925,66.708 J2.1@62.597,64.035 ; J3.39 J2.1@62.67,63.951 ; J2.1@62.802,64.108 63.809,64.108 ; J2.1 ccw(c62.851,63.881) 62.848,64.135 62.819,64.135 62.79,64.128 ccw(c62.851,63.881) 62.782,64.126 62.72,64.108 62.684,64.072 62.802,64.072 J2.1
NetD1_2: D1.2 R2.1 | length 3
  Top Layer w0.254: D1.2 56.947,66.383 R2.1@56.947,63.849
NetJ2_2: J2.2 R1.1 | length 3.8
  Top Layer w0.254: R1.1@65.405,60.314 J2.2@65.405,64.114
NetJ4_2: J4.2 RN3.8 SW1.3 U9.2 | length 59.3
  Top Layer w0.254: RN3.8 83.555,6.633 86.306,6.633 SW1.3 88.143,6.604 88.773,5.974 J4.2 ; v1(132.664,14.986) 132.664,15.134 132.853,15.323 U9.2@132.853,17.292
  Bottom Layer w0.254: SW1.3 93.355,13.624 131.378,13.624 132.664,14.91 v1(132.664,14.986)
NetJ4_4: J4.4 RN3.7 SW1.4 U9.3 | length 60.5
  Top Layer w0.254: RN3.7 84.538,5.861 SW1.4 ; v1(134.109,15.113) 134.117,15.122 134.117,17.287 U9.3@134.123,17.292
  Bottom Layer w0.254: SW1.4 88.392,4.064 J4.4 88.773,8.382 93.611,13.22 132.346,13.22 134.109,14.983 v1(134.109,15.113)
NetU4_5: U4.5 U5.1 | length 13
  Top Layer w0.254: U5.1 120.624,52.64 122.21,51.054 126.619,51.054 127.041,51.476 127.041,52.543 U4.5
NetU4_11: U4.11 U5.15 | length 13.9
  Top Layer w0.254: U5.15@114.782,47.6 114.782,46.519 115.558,45.743 124.991,45.743 125.772,46.524 125.772,47.594 U4.11
NetU6_7: U6.7 U6.15 | length 12.3
  Top Layer w0.254: U6.7 109.093,42.107 110.127,41.072 111.176,41.072 112.278,39.97 112.278,37.995 112.579,37.694 115.136,37.694 115.284,37.842 115.284,38.833 U6.15
PLatch: U5.4 U8.11 | length 36.8
  Top Layer w0.254: v1(103.759,24.384) 103.759,24.483 104.082,24.806 104.082,42.407 107.776,46.102 107.776,48.873 108.814,49.911 110.541,49.911 112.143,51.514 112.143,52.504 U5.4 ; v1(105.918,24.257) 105.923,24.262 105.923,26.078 U8.11
  Bottom Layer w0.254: v1(103.759,24.384) 103.822,24.32 105.855,24.32 v1(105.918,24.257)
PR/{\W\}\: J1A1.4 U2.1 | length 101.6
  Top Layer w0.254: U2.1 35.987,17.272 36.114,17.399 62.461,17.399 62.484,17.376 89.35,17.376 v1(94.183,12.543)
  Bottom Layer w0.254: v1(94.183,12.543) 94.331,12.543 94.604,12.816 122.864,12.816 J1A1.4
VCC: A1.1 A2.1 A3.1 A4.1 A5.1 A6.1 A7.1 A8.1 C1.1 J1.6 J1A1.2 J1D1.1 J1D1.17 J3.38 J3.41 J3.42 R1.2 R2.2 RN1.1 RN1.2 RN1.3 RN1.4 RN2.1 RN2.2 RN2.3 RN2.4 RN3.1 RN3.2 RN3.3 RN3.4 RN4.1 RN4.2 RN4.3 RN4.4 RN5.1 RN5.2 RN5.3 RN5.4 U1.20 U2.20 U3.20 U4.16 U5.16 U6.16 U7.15 U7.20 U8.20 U9.32 | length 63
  Top Layer w0.254: v1(69.85,42.164) 69.85,40.192 U7.15 ; v1(81.788,3.124) 81.788,4.222 RN3.4 RN3.1 ; RN5.1 RN5.2 RN5.3 ; RN2.4 RN2.3 RN2.2 RN2.1 89.324,62.103 v1(90.551,62.103) ; v1(88.392,47.117) 88.392,47.217 88.07,47.539 RN5.3 ; RN5.4 RN5.3 ; v1(93.345,62.103) 94.516,62.103 RN1.4 RN1.3 RN1.2 RN1.1 ; v1(94.474,46.976) 94.474,47.124 94.77,47.42 RN4.1 RN4.2 RN4.3 RN4.4
  Top Layer w0.4: U2.20 38.608,7.972 38.618,7.982 40.494,7.982 v1(40.513,8.001) ; C1.1@57.204,4 C1.1 ; v1(59.055,62.433) 59.02,62.468 59.02,63.814 R2.2@59.058,63.852 ; R1.2 67.44,60.528 v1(68.758,60.528) ; U7.20 80.542,40.181 v1(80.594,40.234) ; U3.20 97.799,35.521 100.649,35.521 100.713,35.585 v1(102.337,35.585) ; U1.20 100.52,23.163 100.547,23.137 101.933,23.137 v1(101.956,23.114) ; U5.16 A5.1@118.288,47.69 ; U6.16@116.724,38.673 119.099,38.673 120.052,37.719 120.37,37.719 v1(120.447,37.643) ; U8.20 117.446,25.996 A8.1@119.626,25.996 ; A5.1@118.313,47.766 118.46,47.619 119.882,47.619 v1(119.888,47.625) ; A8.1@119.863,25.929 119.904,25.97 121.194,25.97 v1(121.216,25.992) ; U9.32@130.313,17.292 130.32,17.3 130.32,18.967 v1(130.327,18.974) ; U4.16 132.242,47.713 134.493,47.713 134.468,47.688 v1(134.468,46.228)
  Top Layer w1: J1D1.1 C1.1@57.204,4
{\B\I\O\R\D\}\: J1.14 J3.25 U7.4 | length 73.6
  Top Layer w0.254: U7.4 72.401,50.887 73.96,52.446 74.544,52.446 75.692,53.594 75.692,55.421 J3.25
  Bottom Layer w0.254: J1.14 27.407,25.502 27.407,27.534 57.658,57.785 75.284,57.785 J3.25
{\B\I\O\W\R\}\: J1.16 J3.23 U7.3 | length 77.6
  Top Layer w0.254: U7.3 73.789,49.599 73.789,50.675 75.354,52.24 75.951,52.24 77.649,53.938 77.649,55.378 J3.23
  Bottom Layer w0.254: J1.16 24.765,25.463 57.491,58.189 76.88,58.189 J3.23
{\I\O\R\D\}\: J1A1.3 U4.13 U7.16 U9.24 | length 149.4
  Top Layer w0.254: U7.16 71.131,45.453 70.554,46.03 70.554,51.123 71.66,52.229 71.66,56.928 78.786,64.054 117.347,64.054 127.831,53.57 127.831,51.594 128.408,51.017 U4.13 v1(128.408,46.016) ; U9.24 128.524,25.4 v1(131.445,28.321) 134.682,28.321 134.931,28.57 138.257,28.57 140.6,26.227 140.6,14.679 134.874,8.953 134.874,4.77 134.22,4.116 J1A1.3
  Bottom Layer w0.254: v1(128.408,46.016) 128.408,31.358 v1(131.445,28.321)
{\I\O\W\R\}\: J1D1.2 U4.3 U7.17 U9.31 | length 152.7
  Top Layer w0.254: J1D1.2 63.376,16.916 88.001,16.916 88.219,16.699 v1(88.367,16.699) ; v1(72.39,32.639) 72.396,32.645 72.396,40.175 U7.17 ; v1(128.043,15.513) 128.936,16.406 128.936,17.286 U9.31 129.043,20.842 v1(129.032,20.853) ; v1(129.678,50.292) U4.3
  Bottom Layer w0.254: v1(72.39,32.639) 72.408,32.639 88.348,16.699 v1(88.367,16.699) 89.8,15.265 127.647,15.265 127.895,15.513 v1(128.043,15.513) ; v1(129.032,20.853) 128.956,20.93 128.956,24.783 127.731,26.007 127.731,48.345 v1(129.678,50.292)
{\P\S\}\: J1D1.3 U2.19 U4.1 U4.15 U6.1 | length 134.2
  Top Layer w0.254: U2.19 34.77,7.873 34.77,6.759 35.464,6.065 45.855,6.065 J1D1.3 ; v1(62.23,18.161) 62.271,18.161 62.652,17.78 98.62,17.78 104.544,23.704 104.544,35.964 105.791,37.211 115.697,37.211 116.124,37.638 116.124,41.448 116.724,42.048 116.724,43.623 U6.1@116.724,43.896 ; U6.1 116.713,44.531 116.886,44.704 129.424,44.704 130.948,46.228 U4.15 131.034,47.776 131.034,48.865 132.218,50.049 U4.1
  Bottom Layer w0.254: J1D1.3 47.994,4 62.155,18.161 v1(62.23,18.161)
{\R\S\T\-\B\}\: J3.1 U7.2 | length 31.7
  Top Layer w0.254: U7.2 75.114,49.654 75.114,50.603 76.096,51.585 76.477,51.585 v1(76.581,51.689)
  Bottom Layer w0.254: v1(76.581,51.689) 81.306,51.689 83.689,54.072 83.689,56.892 84.328,57.531 99.538,57.531 J3.1
{\R\S\T\}\: J1D1.15 U7.18 U8.1 | length 136.6
  Top Layer w0.254: J1D1.15 17.44,23.536 23.021,29.117 69.884,29.117 73.671,32.904 73.671,35.041 v1(73.66,35.052) 73.666,35.058 73.666,40.175 U7.18 ; v1(115.57,32.004) 115.57,32.052 117.359,33.841 U8.1
  Bottom Layer w0.254: v1(73.66,35.052) 100.711,35.052 103.556,37.897 109.677,37.897 v1(115.57,32.004)
{\U\S\B\_\C\S\}\: J1.12 U6.9 | length 84.7
  Top Layer w0.254: v1(104.792,37.169) 104.86,37.169 105.91,38.219 107.65,38.219 107.823,38.392 U6.9
  Bottom Layer w0.254: J1.12 38.354,33.909 102.743,33.909 104.851,36.017 104.851,37.109 v1(104.792,37.169)
pads on no net: J1.8 J1.M J1A1.16 J3.19 J3.20 J3.21 J3.27 J3.29 J3.31 J3.32 J3.34 J3.44 RN3.5 U4.4 U4.6 U4.7 U4.9 U4.10 U4.12 U5.7 U5.9 U5.12 U6.4 U6.5 U6.11 U6.12

## Polygon pours and split planes (outlines as drawn)
GND on Top Layer "GND_L01_P005" (solid, remove dead copper, pour order 5): 10,1.6 141.8,1.6 141.8,68.072 10,68.072
VCC on VCC "VCC_L03_P004" (solid, pour order 4): 10,1.6 141.8,1.6 141.8,68.072 10,68.072
GND on GND "GND_L02_P002" (solid, pour order 2): 10,1.6 141.8,1.6 141.8,68.072 10,68.072
GND on Bottom Layer "GND_L04_P010" (solid, remove dead copper, pour order 10): 10,1.6 141.8,1.6 141.8,68.072 10,68.072

## Keep-outs
Keep-Out Layer:
  the board outline again, w0.203

## Silkscreen, mask and mechanical layers (free items; w line width, h text height)
Top Overlay:
  text "Layout by IanJ" at 17.193,42.418 h1 r90
  text "Acorn IDE podule V6-B-IJ1" at 14.836,8.12 h2 r90
  text "(C) 2026 I Stocks" at 17.272,8.001 h1 r90